# Altium PCB board.PcbDoc
Units mm, origin at the board's own origin, x right, y up, seen from the top; angles counter-clockwise.
Board outline 55.5 x 15 mm, 2 copper layers (Top Layer, Bottom Layer), stack 0.97 mm thick; 19 components, 12 nets, 41 pads, 35 vias.
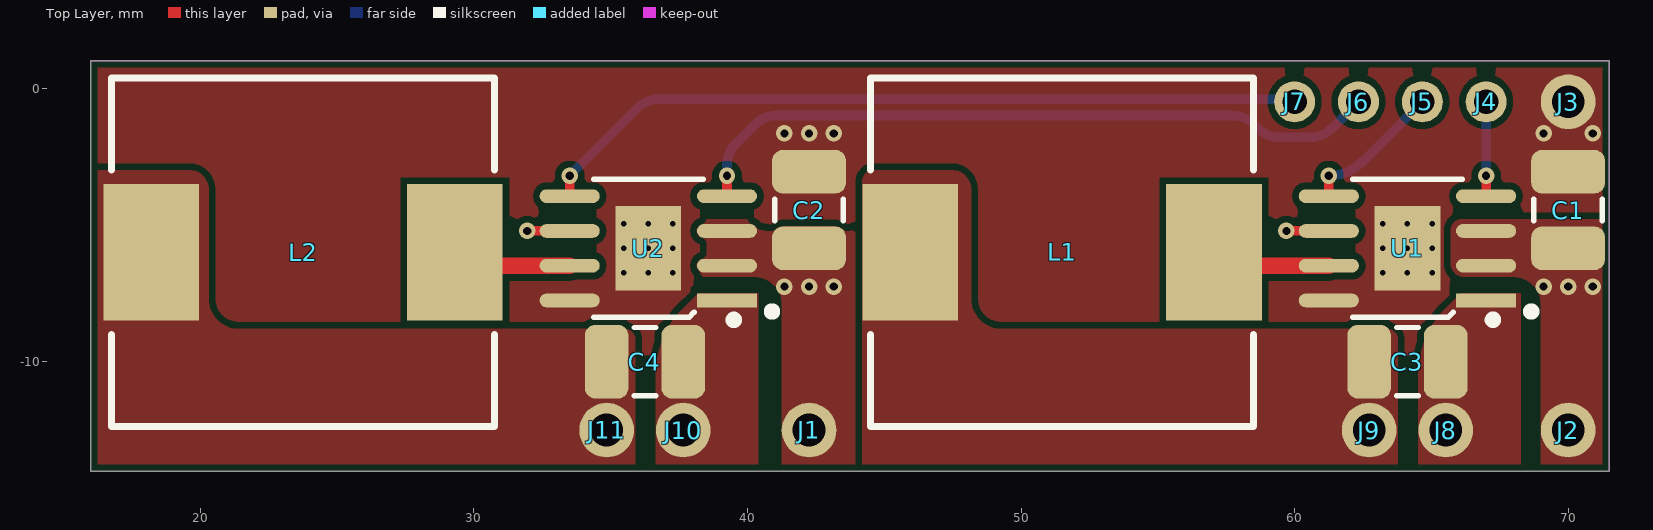
[diagram p0: Top Layer view]
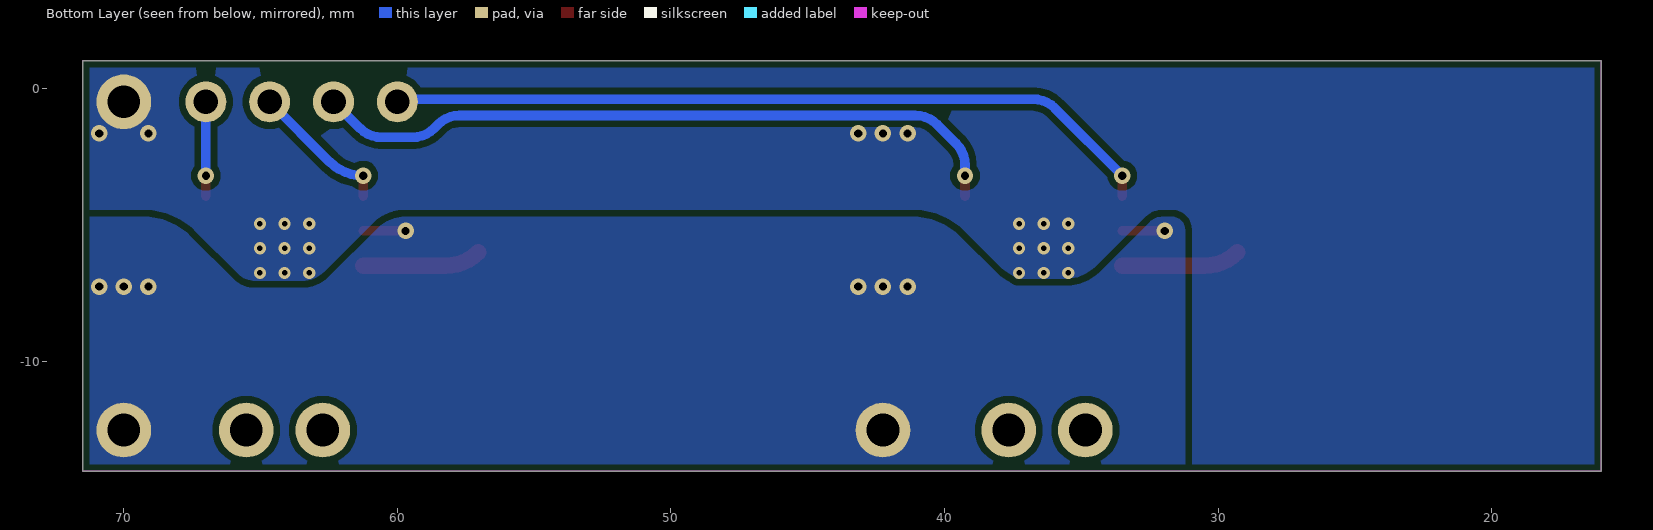
[diagram p1: Bottom Layer view, seen from below]
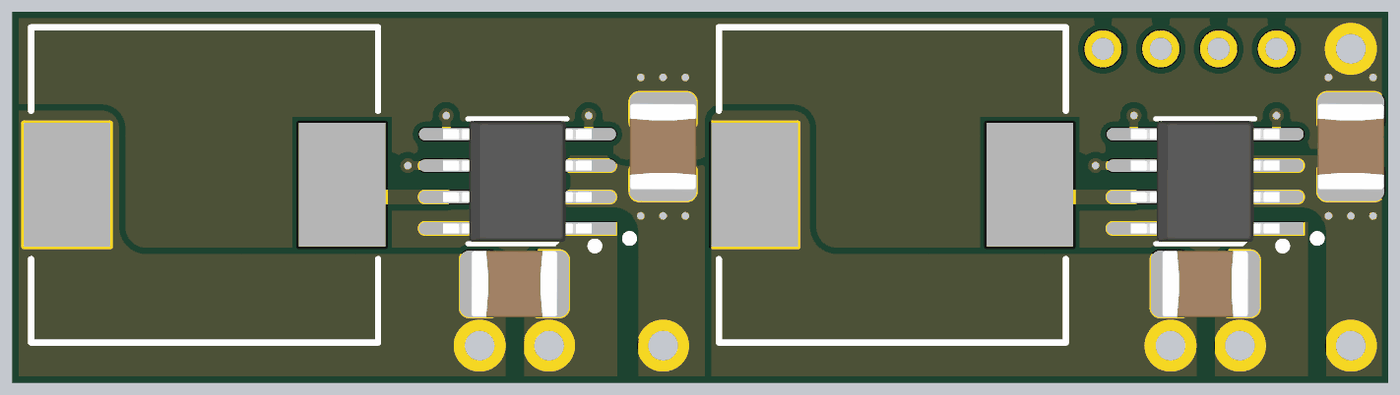
[diagram p2: 3D render of the assembled board from above, using the file's embedded part models]

## Layer stack, top to bottom
Top Solder: solder mask 0.0127, Solder Resist, Dk 3.8
Top Layer: signal copper 0.035
Dielectric: core 0.9, FR-4, Dk 4.5
Bottom Layer: signal copper 0.035
Bottom Solder: solder mask 0.0127, Solder Resist, Dk 3.8

## Board outline
16,-14 16,1 71.5,1 71.5,-14

## Design rules (kind name [scope] priority, off if disabled: settings)
AcuteAngle [All] p1: minimum=6.00000000000000E+0001 checktracksonly=FALSE
Clearance Clearance_1 [All] p1: gap=0.25 ignorepadtopadclearanceinfootprint=FALSE except(0.13: Arc-Arc Arc-Track Arc-SMDPad Arc-Via Track-Track Track-SMDPad Track-Via SMDPad-SMDPad SMDPad-Via THPad-Via Via-Via; 0.15: Arc-THPad Arc-Text Arc-Hole Track-THPad Track-Text Track-Hole SMDPad-THPad SMDPad-Text SMDPad-Hole THPad-THPad THPad-Text THPad-Hole Via-Text Via-Hole Fill-Text Fill-Hole Poly-Text Poly-Hole Region-Text Region-Hole Text-Text Text-Hole)
ComponentClearance ComponentClearance_1 [HasFootprint('TP30_SMD')] p1: gap=-1 collisioncheckmode=3 verticalgap=2540 showdistances=FALSE
ComponentClearance [All] p2: gap=0.3 collisioncheckmode=3 verticalgap=0.254 showdistances=FALSE
HoleSize [All] p1: absolutevalues=TRUE maxlimit=6 minlimit=0.2 maxpercent=80.000 minpercent=20.000
HoleToHoleClearance HoleToHoleClearance_1 [IsVia vs IsThruPin] p1: gap=0.7 allowstackedmicrovias=TRUE
HoleToHoleClearance [All] p2: gap=0.5 allowstackedmicrovias=TRUE
MinimumSolderMaskSliver [All] p1 off: minsoldermaskwidth=0.254
PlaneClearance [All] p1: clearance=0.45
PlaneConnect [All] p1: planeconnectstyle=Direct reliefexpansion=0.3 reliefentries=4 reliefconductorwidth=0.381 reliefairgap=0.178
PolygonConnect [All] p1: connectstyle=Direct reliefconductorwidth=0.381 reliefentries=4 polygonreliefangle="90 Angle" airgapwidth=0.356
RoutingVias [All] p1: holewidth=0.3 width=0.6 viastyle="Through Hole" minholewidth=0.2 minwidth=0.45 maxholewidth=0.9 maxwidth=1.27
SilkToSilkClearance [All] p1 off: silktosilkclearance=0.254
SilkToSolderMaskClearance [IsPad] p1 off: minsilkscreentomaskgap=0.254 clearancetoexposedcopper=TRUE
SolderMaskExpansion [All] p1: expansion=0.102 istentingtop=FALSE
UnRoutedNet [All] p1: checkbadconnections=TRUE
Width [All] p1: maxlimit=3.81 minlimit=0.14 preferedwidth=0.254
21 further rules are at their usual default settings.

## Components (designator, comment, footprint, x,y, rotation, side; value= is the part's Value field where it differs from the comment)
C1 "10uF" C1210 70,-4.455 r270 top
C2 "10uF" C1210 42.25,-4.455 r270 top
C3 "10uF" C1210 64.125,-10 r0 top
C4 "10uF" C1210 36.25,-10 r0 top
J1 "undef" TP30_SMD#1 73.262,-12.5 r0 top
J2 "undef" TP30_SMD#2 70.5,-12.5 r0 top
J3 "undef" TP30_SMD#3 70,-0.5 r0 top
J4 "undef" TP30_SMD#4 67,-0.5 r0 top
J5 "undef" TP30_SMD#4 64.667,-0.5 r0 top
J6 "undef" TP30_SMD#4 62.333,-0.5 r0 top
J7 "undef" TP30_SMD#4 60,-0.5 r0 top
J8 "undef" TP30_SMD#3 65.525,-12.5 r0 top
J9 "undef" TP30_SMD#3 62.725,-12.5 r0 top
J10 "undef" TP30_SMD#5 37.65,-13 r0 top
J11 "undef" TP30_SMD#6 34.85,-13.5 r90 top
L1 "68uH" IND-SMD_L13.8-W12.6 51.5,-6 r180 top
L2 "68uH" IND-SMD_L13.8-W12.6 23.75,-6 r180 top
U1 "ZXBM5210-SP-13" PowerSOIC-8 64.125,-5.855 r90 top
U2 "ZXBM5210-SP-13" PowerSOIC-8 36.375,-5.855 r90 top

## Footprints (in the part's own frame and the unit in brackets; to place one, negate y for a bottom-side part, rotate by r counter-clockwise, add the part's x,y. Pads: shape width x height; smd on the part's side, far side on the other; paste and mask are expansions set on the pad)
C1210 [mm] "Chip Capacitor"
  rrect50% 1.6x2.7 smd mask+0.05: 1(-1.4,0) 2(1.4,0)
  silkscreen extent -0.4,-1.25 0.4,1.25, body extent -1.75,-1.35 1.75,1.35, height 1.8
IND-SMD_L13.8-W12.6 [mm]
  rect 3.5x5 smd: 1(-5.55,0) 2(5.55,0)
  silkscreen extent -7,-6.37 7,6.37, body extent -6.9,-6.3 6.9,6.3, height 3
PowerSOIC-8 [mm]
  rect 0.5x2.2 smd mask+0.05: 1(-1.905,-2.875)
  oval 0.5x2.2 smd mask+0.05: 2(-0.635,-2.875) 3(0.635,-2.875) 4(1.905,-2.875) 5(1.905,2.875) 6(0.635,2.875) 7(-0.635,2.875) 8(-1.905,2.875)
  rect 3.1x2.4 smd mask+0.05: 9(0,0)
  silkscreen extent -2.67,-4.57 2.52,2, body extent -2.45,-3 2.45,3, height 1.68
TP30_SMD#1 [mm] "TP30_SMD"
  round 2 hole 1.2 mask+0.05: 1(-31.012,0)
TP30_SMD#2 [mm] "TP30_SMD"
  round 2 hole 1.2 mask+0.05: 1(-0.5,0)
TP30_SMD#3 [mm] "TP30_SMD"
  round 2 hole 1.2 mask+0.05: 1(0,0)
TP30_SMD#4 [mm] "TP30_SMD"
  round 1.5 hole 0.9 mask+0.05: 1(0,0)
TP30_SMD#5 [mm] "TP30_SMD"
  round 2 hole 1.2 mask+0.05: 1(0,0.5)
TP30_SMD#6 [mm] "TP30_SMD"
  round 2 hole 1.2 mask+0.05: 1(1,0)

## Part data
C1 C2 C3 C4: library part CAP, "10uF 1210"
J1 J2 J3 J4 J5 J6 J7 J8 J9 J10 J11: library part TP_Dup1
L1 L2: library part 4.7uH, "CKST1206-68uH/M"

## Via types
v1: diameter 0.45, hole 0.2, Top Layer to Bottom Layer, tented both sides, 18 vias
v2: diameter 0.6, hole 0.3, Top Layer to Bottom Layer, tented both sides, 17 vias

## Nets (pads, with @x,y where several pads share a name; then routed paths per layer and width w, separated by ;. In a path a pad name is that pad's centre, name@x,y a point inside that pad or via, vN(x,y) a via of type N, cw(c..) or ccw(c..) an arc to the next point about the centre after c; other vN are vias at no path point)
GND: C1.1 C2.1 J3.1 U1.8 U1.9 U2.8 U2.9
  other v1: 35.475,-6.755 36.375,-6.755 37.275,-6.755 63.225,-6.755 64.125,-6.755 65.025,-6.755 35.475,-5.855 36.375,-5.855 37.275,-5.855 63.225,-5.855 64.125,-5.855 65.025,-5.855 35.475,-4.955 36.375,-4.955 37.275,-4.955 63.225,-4.955 64.125,-4.955 65.025,-4.955
  other v2: 41.35,-1.655 42.25,-1.655 43.15,-1.655 69.1,-1.655 70.9,-1.655
NetC1_2: C1.2 C2.2 J1.1 J2.1 U1.2 U1.3 U1.6 U2.2 U2.3 U2.6 | length 3.1
  Top Layer w0.35: v2(31.95,-5.22) U2.6 ; v2(59.7,-5.22) U1.6
  other v2: 41.35,-7.255 42.25,-7.255 43.15,-7.255 69.1,-7.255 70,-7.255 70.9,-7.255
NetC3_1: C3.1 J9.1 L1.2
NetC3_2: C3.2 J8.1 U1.1
NetC4_1: C4.1 J11.1 L2.2
NetC4_2: C4.2 J10.1 U2.1
NetJ4_1: J4.1 U1.4 | length 3.4
  Top Layer w0.35: U1.4 v2(67,-3.2)
  Bottom Layer w0.35: v2(67,-3.2) J4.1
NetJ5_1: J5.1 U1.5 | length 5.2
  Top Layer w0.35: U1.5 v2(61.25,-3.2)
  Bottom Layer w0.35: v2(61.25,-3.2) ccw(c61.25,-1.469) 62.474,-2.693 J5.1
NetJ6_1: J6.1 U2.4 | length 25.9
  Top Layer w0.35: U2.4 v2(39.25,-3.2)
  Bottom Layer w0.35: v2(39.25,-3.2) 39.25,-2.813 cw(c40.368,-2.813) 39.577,-2.023 40.273,-1.327 cw(c41.063,-2.118) 41.063,-1 57.743,-1 cw(c57.743,-2.07) 58.5,-1.313 58.659,-1.473 ccw(c59.449,-0.682) 59.449,-1.8 60.57,-1.8 ccw(c60.57,-0.682) 61.361,-1.473 J6.1
NetJ7_1: J7.1 U2.5 | length 28.4
  Top Layer w0.35: U2.5 v2(33.5,-3.2)
  Bottom Layer w0.35: v2(33.5,-3.2) 35.972,-0.727 cw(c36.763,-1.518) 36.763,-0.4 59.759,-0.4 cw(c59.759,-0.741) J7.1
NetL1_1: L1.1 U1.7 | length 4.3
  Top Layer w0.6: L1.1 ccw(c58.232,-4.818) 58.232,-6.49 U1.7
NetL2_1: L2.1 U2.7 | length 4.3
  Top Layer w0.6: L2.1 ccw(c30.482,-4.818) 30.482,-6.49 U2.7

## Polygon pours and split planes (outlines as drawn)
NetC3_2 on Top Layer "NONET_L02_P-001" (solid, remove dead copper, pour order 1): 66.075,-7.5 65.514,-8.061 ccw(c67.903,-10.449) 64.525,-10.449 64.525,-15.6 68.275,-15.6 68.275,-7.5
NetC1_2 on Top Layer "NONET_L02_P-001" (solid, remove dead copper, pour order 8): 41.25,-7.9 ccw(c40.25,-7.9) 40.25,-6.9 38.45,-6.9 cw(c38.45,-6.4) 37.95,-6.4 37.95,-5.2 cw(c38.35,-5.2) 38.35,-4.8 45,-4.8 45,-9.85 45,-14.6 41.25,-14.6
GND on Top Layer "NONET_L02_P-001" (solid, remove dead copper, pour order 6): 15.5,2.5 15.5,-15.3 74.2,-15.3 74.2,2.5
NetC3_1 on Top Layer "NONET_L02_P-001" (solid, remove dead copper, pour order 5): 44.6,-3 ccw(c44.6,-3.4) 44.2,-3.4 44.2,-14.4 63.775,-14.4 63.775,-9.2 ccw(c63.375,-9.2) 63.375,-8.8 49.275,-8.8 cw(c49.275,-7.7) 48.175,-7.7 48.175,-3.7 ccw(c47.475,-3.7) 47.475,-3
NetC4_1 on Top Layer "NONET_L02_P-001" (solid, remove dead copper, pour order 4): 35.5,-8.8 21.4,-8.8 cw(c21.4,-7.7) 20.3,-7.7 20.3,-3.7 ccw(c19.6,-3.7) 19.6,-3 15.4,-3 15.4,-14.4 35.9,-14.4 35.9,-9.2 ccw(c35.5,-9.2)
NetC1_2 on Top Layer "NONET_L02_P-001" (solid, remove dead copper, pour order 2): 69,-7.9 ccw(c68,-7.9) 68,-6.9 66.2,-6.9 cw(c66.2,-6.4) 65.7,-6.4 65.7,-5.2 cw(c66.1,-5.2) 66.1,-4.8 72.75,-4.8 72.75,-9.85 72.75,-14.6 69,-14.6
NetC4_2 on Top Layer "NONET_L02_P-001" (solid, remove dead copper, pour order 0): 38.2,-7.5 37.639,-8.061 ccw(c40.028,-10.449) 36.65,-10.449 36.65,-14.6 40.4,-14.6 40.4,-7.5
GND on Bottom Layer "NONET_L02_P-001" (solid, remove dead copper, pour order 9): 15.5,2.5 15.5,-15.3 74.2,-15.3 74.2,2.5
NetC1_2 on Bottom Layer "NONET_L02_P-001" (solid, remove dead copper, pour order 7): 31.7,-4.7 32.017,-4.7 cw(c32.017,-5.383) 32.5,-4.9 34.307,-6.707 ccw(c35.569,-5.444) 35.569,-7.23 36.947,-7.23 ccw(c36.947,-5.604) 38.096,-6.754 39.406,-5.444 cw(c41.202,-7.24) 41.202,-4.7 45.7,-4.7 59.7,-4.7 cw(c59.7,-6.148) 60.724,-5.124 62.5,-6.9 ccw(c63.466,-5.934) 63.466,-7.3 65.208,-7.3 ccw(c65.208,-6.178) 66.001,-6.971 67.528,-5.444 cw(c69.324,-7.24) 69.324,-4.7 71.8,-4.7 71.8,-14.7 31.2,-14.7 31.2,-5.2 cw(c31.7,-5.2)

## Keep-outs
Keep-Out Layer:
  lines w0: 16,-14 71.5,-14 71.5,-13.25 71.5,1 16,1 16,-14